# Altium PCB OFP_SCM_v1.6.PcbDoc (part 3 of 3)
Units mil, origin at the board's own origin, x right, y up, seen from the top; angles counter-clockwise.
Board outline 4724.41 x 4330.71 mil, 2 copper layers (Top Layer, Bottom Layer), stack 62.256 mil thick; 103 components, 84 nets, 458 pads, 396 vias.
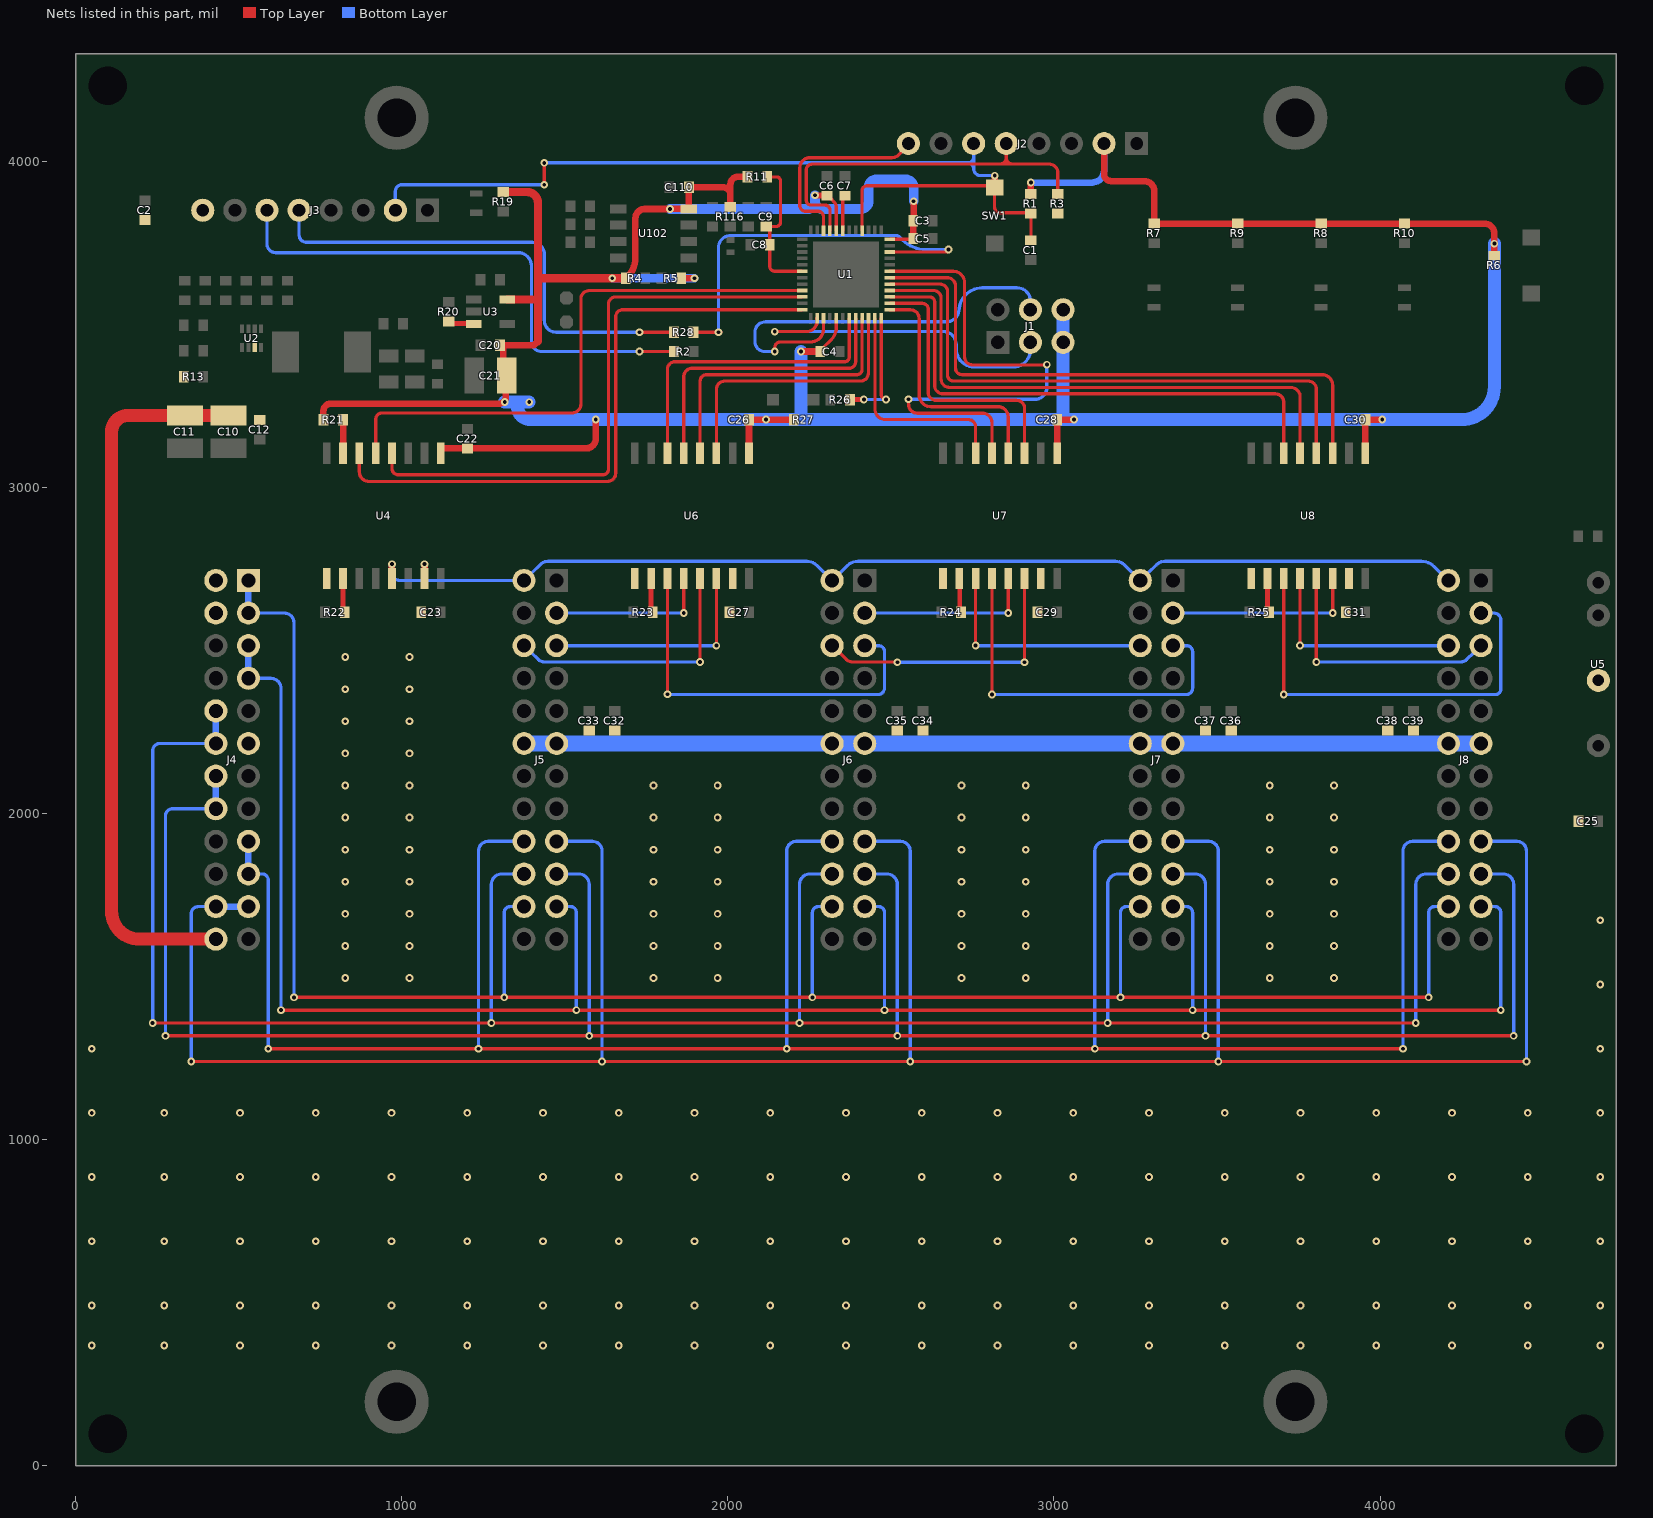
[diagram p2: the nets of this part, all layers, seen from the top]

## Via types
v1: diameter 23.62, hole 11.81, Top Layer to Bottom Layer, tented both sides, 396 vias

## Nets (pads, with @x,y where several pads share a name; then routed paths per layer and width w, separated by ;. In a path a pad name is that pad's centre, name@x,y a point inside that pad or via, vN(x,y) a via of type N, cw(c..) or ccw(c..) an arc to the next point about the centre after c; other vN are vias at no path point) (continued)
NetR20_1: R20.1 U3.3 | length 78.3
  Top Layer w10: R20.1@1144.48,3509.37 1156.98,3501.78 R20.1@1160.2,3501.78
  Top Layer w15: R20.1@1160.2,3503.65 1204.07,3503.65 U3.3@1220.58,3501.97
NetR21_1: R21.1 U4.7 | length 108.7
  Top Layer w10: R21.1@819.88,3206.1 cw(c822.44,3206.1) R21.1@822.44,3208.66
  Top Layer w20: U4.7@819.88,3101.39 R21.1@819.88,3206.1
NetR22_1: R22.1 U4.10 | length 102.4
  Top Layer w10: U4.10@819.88,2725.39 cw(c819.88,2722.83) U4.10@822.44,2722.83
  Top Layer w15: R22.1@819.88,2623.11 U4.10@819.88,2721.46
NetR23_2: R23.2 U6.10 | length 102.4
  Top Layer w10: U6.10@1764.76,2725.39 cw(c1764.76,2722.83) U6.10@1767.32,2722.83
  Top Layer w15: R23.2@1764.76,2623.11 U6.10@1764.76,2721.46
NetR24_2: R24.2 U7.10 | length 105.4
  Top Layer w15: U7.10@2709.65,2721.46 2710.85,2720.25 2710.85,2621.9 R24.2@2714.65,2618.11
NetR25_2: R25.2 U8.10 | length 102.4
  Top Layer w10: R25.2@3654.53,2620.67 ccw(c3657.09,2620.67) R25.2@3657.09,2618.11
  Top Layer w15: R25.2@3654.53,2623.11 U8.10@3654.53,2721.46
NetR26_1: R26.1 U1.24 | length 368.6
  Top Layer w10: U1.24@2470.47,3519.39 2470.47,3284.53 ccw(c2485,3284.53) v1(2485,3270)
  Top Layer w15: R26.1@2374.08,3270 v1(2417,3270)
  Bottom Layer w10: v1(2417,3270) v1(2485,3270)
NetR28_1: R28.1 U1.34 | length 1265.8
  Top Layer w10: R28.1@1895.19,3476.38 v1(1971,3476.38) v1@1978,3476.38 ; U1.34@2496.35,3722.44 2669.02,3722.44 ccw(c2669.02,3729.84) v1(2676.42,3729.84)
  Bottom Layer w10: v1(1971,3476.38) 1971,3735.12 cw(c2009.2,3735.12) 2009.2,3773.32 2511.96,3773.32 cw(c2511.96,3750) 2528.45,3766.49 2535.82,3759.12 ccw(c2606.53,3829.84) 2606.53,3729.84 v1(2676.42,3729.84)
NGND: C23.1 C25.1 C27.1 C29.1 C31.1 C32.1 C33.1 C34.1 C35.1 C36.1 C37.1 C38.1 C39.1 J4.2 J4.4 J4.11 J5.11 J5.12 J6.11 J6.12 J7.11 J7.12 J8.11 J8.12 U4.9 U4.15 U5.4 U6.9 U6.15 U7.9 U7.15 U8.9 U8.15 | length 2974.6
  Top Layer w20: U4.15@1069.88,2725.39 v1(1069.88,2765.31)
  Bottom Layer w50: J5.12@1374.8,2215.35 J5.11@1474.8,2215.35 J6.12@2319.68,2215.35 J6.11@2419.68,2215.35 J7.12@3264.57,2215.35 J7.11@3364.57,2215.35 J8.12@4209.45,2215.35 J8.11@4309.45,2215.35
  other v1: 49.37,369.33 271.65,369.33 503.94,369.33 736.22,369.33 968.5,369.33 1200.79,369.33 1433.07,369.33 1665.35,369.33 1897.64,369.33 2129.92,369.33 2362.2,369.33 2594.49,369.33 2826.77,369.33 3059.05,369.33 3291.34,369.33 3523.62,369.33 3755.91,369.33 3988.19,369.33 4220.47,369.33 4452.76,369.33 4675.04,369.33 49.37,492.13 271.65,492.13 503.94,492.13 736.22,492.13 968.5,492.13 1200.79,492.13 1433.07,492.13 1665.35,492.13 1897.64,492.13 2129.92,492.13 2362.2,492.13 2594.49,492.13 2826.77,492.13 3059.05,492.13 3291.34,492.13 3523.62,492.13 3755.91,492.13 3988.19,492.13 4220.47,492.13 4452.76,492.13 4675.04,492.13 49.37,688.98 271.65,688.98 503.94,688.98 736.22,688.98 968.5,688.98 1200.79,688.98 1433.07,688.98 1665.35,688.98 1897.64,688.98 2129.92,688.98 2362.2,688.98 2594.49,688.98 2826.77,688.98 3059.05,688.98 3291.34,688.98 3523.62,688.98 3755.91,688.98 3988.19,688.98 4220.47,688.98 4452.76,688.98 4675.04,688.98 49.37,885.83 271.65,885.83 503.94,885.83 736.22,885.83 968.5,885.83 1200.79,885.83 1433.07,885.83 1665.35,885.83 1897.64,885.83 2129.92,885.83 2362.2,885.83 2594.49,885.83 2826.77,885.83 3059.05,885.83 3291.34,885.83 3523.62,885.83 3755.91,885.83 3988.19,885.83 4220.47,885.83 4452.76,885.83 4675.04,885.83 49.37,1082.68 271.65,1082.68 503.94,1082.68 736.22,1082.68 968.5,1082.68 1200.79,1082.68 1433.07,1082.68 1665.35,1082.68 1897.64,1082.68 2129.92,1082.68 2362.2,1082.68 2594.49,1082.68 2826.77,1082.68 3059.05,1082.68 3291.34,1082.68 3523.62,1082.68 3755.91,1082.68 3988.19,1082.68 4220.47,1082.68 4452.76,1082.68 4675.04,1082.68 49.37,1279.53 4675.04,1279.53 4675.04,1476.38 826.77,1496.06 1023.62,1496.06 1771.65,1496.06 1968.5,1496.06 2716.54,1496.06 2913.39,1496.06 3661.42,1496.06 3858.27,1496.06 826.77,1594.49 1023.62,1594.49 1771.65,1594.49 1968.5,1594.49 2716.54,1594.49 2913.39,1594.49 3661.42,1594.49 3858.27,1594.49 4675.04,1673.23 826.77,1692.91 1023.62,1692.91 1771.65,1692.91 1968.5,1692.91 2716.54,1692.91 2913.39,1692.91 3661.42,1692.91 3858.27,1692.91 826.77,1791.34 1023.62,1791.34 1771.65,1791.34 1968.5,1791.34 2716.54,1791.34 2913.39,1791.34 3661.42,1791.34 3858.27,1791.34 826.77,1889.76 1023.62,1889.76 1771.65,1889.76 1968.5,1889.76 2716.54,1889.76 2913.39,1889.76 3661.42,1889.76 3858.27,1889.76 826.77,1988.19 1023.62,1988.19 1771.65,1988.19 1968.5,1988.19 2716.54,1988.19 2913.39,1988.19 3661.42,1988.19 3858.27,1988.19 826.77,2086.61 1023.62,2086.61 1771.65,2086.61 1968.5,2086.61 2716.54,2086.61 2913.39,2086.61 3661.42,2086.61 3858.27,2086.61 826.77,2185.04 1023.62,2185.04 826.77,2283.46 1023.62,2283.46 826.77,2381.89 1023.62,2381.89 826.77,2480.31 1023.62,2480.31
NRST: C1.2 J2.6 J3.2 R1.2 SW1.1 U1.40 | length 2966.5
  Top Layer w10: v1(1437.01,3928.82) v1(1437.01,3995.75) ; U1.40@2411.42,3788.78 2411.42,3911.02 cw(c2425.59,3911.02) 2425.59,3925.2 SW1.1@2817.83,3925.2 ; SW1.1@2796.06,3904.45 SW1.1@2796.06,3904.66 ; SW1.1@2818.11,3920.51 SW1.1@2817.83,3920.23 2817.83,3859.33 ccw(c2834.65,3859.33) 2834.65,3842.52 2929.13,3842.52 R1.2@2929.13,3840.08 C1.2@2929.13,3758.35
  Top Layer w20: SW1.1@2818.11,3920.51 v1(2818.11,3956.69)
  Bottom Layer w10: J3.2@980.31,3850.39 980.31,3908.83 cw(c1000.3,3908.83) 1000.3,3928.82 v1(1437.01,3928.82) ; v1(1437.01,3995.75) 2736.16,3995.75 ; 2727.61,3995.58 2753.54,3995.58 ; 2753.54,3978.37 ccw(c2736.16,3978.37) 2736.16,3995.75 ; J2.6@2753.54,4055.12 2753.54,4013.13 ; v1(2818.11,3956.69) 2774.88,3956.69 cw(c2774.88,3978.03) 2753.54,3978.03 2753.54,4013.13 ; 2736.16,3995.75 ccw(c2736.16,4013.13) 2753.54,4013.13
SCLK: J5.2 J6.2 J7.2 J8.2 U4.13 | length 3452.6
  Top Layer w20: U4.13@969.88,2725.39 v1(969.88,2765.31)
  Bottom Layer w10: v1(969.88,2765.31) 969.88,2738.78 ccw(c993.31,2738.78) 993.31,2715.35 J5.2@1374.8,2715.35 1424.36,2763.74 1424.54,2763.92 cw(c1449.49,2738.81) 1449.49,2774.21 ; 1449.54,2774.21 2242.54,2774.21 2242.63,2774.21 cw(c2242.61,2732.98) 2271.68,2762.22 2271.88,2762.02 J6.2@2319.68,2715.35 ; J6.2@2319.68,2715.35 2365.64,2760.23 2365.87,2760.45 cw(c2399.23,2726.9) 2399.23,2774.21 3188.71,2774.21 cw(c3188.71,2735.98) 3215.66,2763.09 3215.85,2762.91 J7.2@3264.57,2715.35 3312.74,2762.39 3312.95,2762.59 cw(c3341.12,2734.24) 3341.12,2774.21 4126.33,2774.21 cw(c4126.33,2718.13) 4166.08,2757.7 J8.2@4209.45,2715.35
SERIAL_RXD: J1.3 U1.14 | length 1044.2
  Top Layer w10: v1(2143.93,3478.35) 2240.79,3478.35 ccw(c2240.79,3511.25) U1.14@2272.73,3519.17
  Bottom Layer w10: v1(2143.93,3478.35) 2660.96,3478.35 cw(c2660.96,3439.37) 2699.94,3439.37 2699.94,3425.66 ccw(c2755.6,3425.66) 2755.6,3370 2875,3370 ccw(c2875,3422.76) J1.3@2927.76,3422.76
  Bottom Layer w15: J1.3@2927.76,3439.37 J1.3@2927.76,3445.37
SERIAL_TXD: J1.4 U1.15 | length 1309.5
  Top Layer w10: 2143.93,3429.82 cw(c2160.66,3429.82) 2160.66,3446.55 2253.57,3446.55 ccw(c2253.57,3486.13) 2293.15,3486.13 2293.15,3519.39 U1.15@2293.3,3519.39
  Bottom Layer w10: v1(2143.93,3417.32) 2113.26,3417.32 cw(c2113.26,3447.58) 2083,3447.58 2083,3476.1 cw(c2115.11,3476.1) 2115.11,3508.21 2669.7,3508.21 ccw(c2669.7,3547.24) 2708.74,3547.24 ; 2708.74,3541.24 cw(c2780.33,3541.24) 2780.33,3612.83 2886.63,3612.83 cw(c2886.63,3571.71) J1.4@2927.76,3571.71 ; J1.4@2927.76,3539.37 J1.4@2927.76,3545.37 J1.4@2927.76,3571.71 ; J1.4@2927.76,3577.71 J1.4@2927.76,3571.71
SPI_CSS1: U1.22 U6.3 | length 861.5
  Top Layer w10: U6.3@1964.76,3101.39 1964.76,3300.65 cw(c1990.88,3300.65) 1990.88,3326.77 2406.64,3326.77 ccw(c2406.64,3351.24) 2431.1,3351.24 U1.22@2431.1,3518.31
SPI_CSS2: U1.21 U6.4 | length 898.3
  Top Layer w10: U6.4@1914.76,3101.39 1914.76,3325.97 cw(c1935.25,3325.97) 1935.25,3346.46 2396.38,3346.46 ccw(c2396.38,3361.5) 2411.42,3361.5 U1.21@2411.42,3518.31
SPI_CSS3: U1.20 U6.5 | length 924.2
  Top Layer w10: U6.5@1864.76,3101.39 1864.76,3340.03 cw(c1890.88,3340.03) 1890.88,3366.14 2372.05,3366.14 ccw(c2372.05,3385.83) 2391.73,3385.83 U1.20@2391.73,3518.31
SPI_CSS4: U1.19 U6.6 | length 958.5
  Top Layer w10: U6.6@1814.76,3101.39 1814.76,3362.98 cw(c1837.61,3362.98) 1837.61,3385.83 2358.27,3385.83 ccw(c2358.27,3399.61) 2372.05,3399.61 U1.19@2372.05,3518.31
SPI_CSS5: U1.26 U7.3 | length 847.6
  Top Layer w10: U1.26@2497.44,3564.96 2596.65,3564.96 cw(c2596.65,3547.24) 2614.37,3547.24 2614.37,3291.24 ccw(c2637.89,3291.24) 2637.89,3267.72 2885.19,3267.72 cw(c2885.19,3243.26) 2909.65,3243.26 U7.3@2909.65,3105.31 U7.3@2909.65,3101.39
SPI_CSS6: U1.25 U7.4 | length 777.2
  Top Layer w10: U1.25@2506.91,3544.76 U1.25@2496.35,3545.27 2559.57,3545.27 cw(c2559.57,3518.31) 2586.53,3518.31 2586.53,3284.35 ccw(c2622.74,3284.24) 2622.89,3248.03 2828.37,3248.03 cw(c2828.37,3216.76) 2859.65,3216.76 U7.4@2859.65,3105.31 U7.4@2859.65,3101.39
SPI_CSS7: U1.31 U7.5 | length 1659.1
  Top Layer w10: U1.31@2496.35,3663.38 2690.72,3663.38 cw(c2690.72,3628.42) 2725.68,3628.42 2725.68,3400.25 ccw(c2749.64,3400.25) 2749.64,3376.29 v1@2978,3376.29 ; 2554,3254.15 v1(2554,3270.71) ; 2554.47,3254.15 ccw(c2580.28,3254.15) 2580.28,3228.35 2780.6,3228.35 cw(c2780.6,3199.31) 2809.65,3199.31 U7.5@2809.65,3105.31 U7.5@2809.65,3101.39
  Bottom Layer w10: v1(2554,3270.71) 2941.62,3270.71 ccw(c2941.62,3307.09) 2978,3307.09 v1(2978,3377)
SPI_CSS8: U1.23 U7.6 | length 702.2
  Top Layer w10: U1.23@2450.79,3518.31 2450.79,3241.14 ccw(c2483.27,3241.14) 2483.27,3208.66 2737.23,3208.66 cw(c2737.23,3186.24) 2759.65,3186.24 U7.6@2759.65,3101.39
SPI_CSS9: U1.30 U8.3 | length 1865.9
  Top Layer w10: U1.30@2497.44,3643.7 2672.13,3643.7 cw(c2672.13,3617.72) 2698.11,3617.72 2698.11,3366.11 ccw(c2717.77,3366.11) 2717.77,3346.46 3822.16,3346.46 cw(c3822.16,3314.08) 3854.53,3314.08 U8.3@3854.53,3105.31 U8.3@3854.53,3101.39
SPI_CSS10: U1.29 U8.4 | length 1801.3
  Top Layer w10: U1.29@2497.44,3624.02 2650.75,3624.02 cw(c2650.75,3601.34) 2673.42,3601.34 2673.42,3345.24 ccw(c2691.9,3345.24) 2691.9,3326.77 3779.43,3326.77 cw(c3779.43,3301.67) 3804.53,3301.67 U8.4@3804.53,3105.31 U8.4@3804.53,3101.39
SPI_CSS11: U1.28 U8.5 | length 1726.9
  Top Layer w10: U1.28@2497.44,3604.33 2630.47,3604.33 cw(c2630.47,3581.06) 2653.74,3581.06 2653.74,3333.12 ccw(c2679.77,3333.12) 2679.77,3307.09 3726.52,3307.09 cw(c3726.52,3279.08) 3754.53,3279.08 U8.5@3754.53,3105.31 U8.5@3754.53,3101.39
SPI_CSS12: U1.27 U8.6 | length 1661.6
  Top Layer w10: U1.27@2497.44,3584.65 2618.93,3584.65 cw(c2618.93,3569.52) 2634.05,3569.52 2634.05,3313.33 ; 2634.05,3313.26 ccw(c2659.92,3313.26) 2659.92,3287.4 3678.7,3287.4 cw(c3678.7,3261.58) 3704.53,3261.58 U8.6@3704.53,3101.39
SPI_MISO: U1.12 U4.6 | length 1933.3
  Top Layer w10: U4.6@869.88,3101.39 869.88,3048.48 ccw(c899.49,3048.48) 899.49,3018.86 1631,3018.86 ccw(c1631,3043.73) 1655.87,3043.73 1655.87,3523.49 cw(c1677.66,3523.49) 1677.66,3545.28 U1.12@2226.97,3545.28
SPI_MOSI: U1.9 U4.5 | length 1774.8
  Top Layer w10: U4.5@919.88,3105.31 919.88,3208.8 cw(c940.16,3208.8) 940.16,3229.08 1522.32,3229.08 ccw(c1522.32,3256.22) 1549.46,3256.22 1549.46,3578.77 cw(c1575.02,3578.77) 1575.02,3604.33 U1.9@2226.97,3604.33
SPI_SCK: U1.10 U4.4 | length 1839.5
  Top Layer w10: U4.4@969.88,3101.39 969.88,3058.66 ccw(c989.29,3058.66) 989.29,3039.25 1616.91,3039.25 ccw(c1616.91,3056.2) 1633.86,3056.2 1633.86,3562.58 cw(c1655.92,3562.58) 1655.92,3584.65 U1.10@2226.97,3584.65
SS1: J5.5 U6.14 | length 700
  Top Layer w10: v1(1964.76,2515.35) U6.14@1964.76,2725.39
  Bottom Layer w10: J5.5@1474.8,2515.35 v1(1964.76,2515.35)
SS2: J5.6 U6.13 | length 819.3
  Top Layer w10: v1(1914.76,2465.35) U6.13@1914.76,2721.46 U6.13@1914.76,2725.39
  Bottom Layer w10: J5.6@1374.8,2515.35 1418.17,2473.01 1418.31,2472.88 ccw(c1436.61,2491.37) 1436.61,2465.35 ; 1436.65,2465.35 v1(1914.76,2465.35)
SS3: J5.3 U6.12 | length 500
  Top Layer w10: v1(1864.76,2615.35) U6.12@1864.76,2725.39
  Bottom Layer w10: J5.3@1474.8,2615.35 v1(1864.76,2615.35)
SS4: J6.5 U6.11 | length 1218.9
  Top Layer w10: v1(1814.76,2366.14) U6.11@1814.76,2721.46 U6.11@1814.76,2725.39
  Bottom Layer w10: v1@1814.76,2365.35 2444.74,2365.35 2459.9,2365.35 ccw(c2459.9,2385.76) 2480.31,2385.44 ccw(c2459.9,2385.76) 2480.31,2385.76 2480.31,2497.17 ccw(c2462.13,2497.17) 2462.13,2515.35 J6.5@2419.68,2515.35
SS5: J6.6 U7.14 | length 870.3
  Top Layer w10: J6.6@2319.68,2515.35 2363.05,2473.01 ; 2363.19,2472.88 ccw(c2381.49,2491.37) 2381.49,2465.35 2518.9,2465.35 cw(c2518.9,2464.57) v1(2519.68,2464.57) ; v1(2909.65,2464.57) U7.14@2909.65,2725.39
  Bottom Layer w10: v1(2519.68,2464.57) v1(2909.65,2464.57)
SS6: J6.3 U7.13 | length 550
  Top Layer w10: v1(2859.65,2615.35) U7.13@2859.65,2725.39
  Bottom Layer w10: J6.3@2419.68,2615.35 v1(2859.65,2615.35)
SS7: J7.5 U7.12 | length 1168.9
  Top Layer w10: v1@2809.65,2366.14 U7.12@2809.65,2725.39
  Bottom Layer w10: v1(2809.65,2365.35) 3404.79,2365.35 ccw(c3404.79,2385.76) 3425.2,2385.76 3425.2,2497.17 ccw(c3407.01,2497.17) 3407.01,2515.35 J7.5@3364.57,2515.35
SS8: J7.6 U7.11 | length 714.5
  Top Layer w10: v1(2759.65,2515.75) U7.11@2759.65,2725.39
  Bottom Layer w10: v1@2759.84,2515.75 2760.24,2515.35 J7.6@3264.57,2515.35
SS9: J7.3 U8.14 | length 600
  Top Layer w10: v1(3854.53,2615.35) U8.14@3854.53,2725.39
  Bottom Layer w10: J7.3@3364.57,2615.35 v1(3854.53,2615.35)
SS10: J8.5 U8.13 | length 784.2
  Top Layer w10: v1(3804.53,2465.35) U8.13@3804.53,2721.46 U8.13@3804.53,2725.39
  Bottom Layer w10: v1(3804.53,2465.35) 4247.6,2465.35 ; 4247.64,2465.35 ccw(c4247.64,2491.37) 4265.94,2472.88 4266.08,2473.02 J8.5@4309.45,2515.35
SS11: J8.6 U8.12 | length 664.6
  Top Layer w10: v1(3754.53,2515.75) U8.12@3754.53,2725.39
  Bottom Layer w10: v1@3754.53,2515.35 J8.6@4209.45,2515.35
SS12: J8.3 U8.11 | length 1322.3
  Top Layer w10: v1(3704.53,2365.35) U8.11@3704.53,2721.46 U8.11@3704.53,2725.39
  Bottom Layer w10: v1(3704.53,2365.35) 4353.55,2365.35 ccw(c4353.55,2381.89) 4370.08,2381.89 4370.08,2594.49 ccw(c4349.21,2594.49) 4349.21,2615.35 J8.3@4309.45,2615.35 ; v1@3704.53,2366.14 ccw(c3706.43,2368.04) v1@3706.43,2365.35
SWDCLK: J2.5 R3.1 U1.45 | length 1231.1
  Top Layer w10: 2258.8,3992.13 ccw(c2258.8,3973.48) 2240.16,3973.48 2240.16,3881.45 ccw(c2255.4,3881.45) 2255.4,3866.21 2298.17,3866.21 cw(c2298.17,3851.39) 2312.99,3851.39 U1.45@2312.99,3787.69 ; 2258.84,3992.13 2853.54,3992.13 ; 2834.65,3992.13 ccw(c2834.65,4011.02) 2853.54,4011.02 ccw(c2872.44,4011.02) 2872.44,3992.13 ; J2.5@2853.54,4055.12 2853.54,3992.13 ; R3.1@3011.81,3900.08 3011.81,3965.71 ccw(c2985.39,3965.71) 2985.39,3992.13 2853.54,3992.13
SWDIO: J2.8 U1.46 | length 619.9
  Top Layer w10: U1.46@2293.3,3787.69 2293.3,3830.58 ccw(c2276.54,3830.58) 2276.54,3847.34 2238.6,3847.34 cw(c2238.6,3865.47) 2220.47,3865.47 2220.47,3980.71 cw(c2251.57,3980.71) 2251.57,4011.81 2503.54,4011.81 ccw(c2503.54,4040.67) 2523.95,4020.26 J2.8@2556.17,4052.49
UART_RXD: J3.5 R28.2 | length 1482.4
  Top Layer w10: v1(1728.91,3476.38) 1834.17,3476.38 R28.2@1834.67,3476.38
  Bottom Layer w10: J3.5@685.04,3850.39 685.04,3775.47 ccw(c708.54,3775.47) 708.54,3751.97 1400.88,3751.97 cw(c1400.88,3715.85) 1437.01,3715.85 1437.01,3512.85 ccw(c1473.48,3512.85) 1473.48,3476.38 v1(1728.91,3476.38)
UART_TXD: J3.6 R2.2 | length 1638.1
  Top Layer w10: v1(1728.9,3417.32) R2.2@1834.16,3417.32
  Bottom Layer w10: J3.6@586.61,3850.39 586.61,3747.55 ccw(c613.69,3747.55) 613.69,3720.47 1356.81,3720.47 cw(c1356.81,3679.65) 1397.64,3679.65 1397.64,3448.6 ccw(c1428.92,3448.6) 1428.92,3417.32 v1(1728.9,3417.32)
VA_N: J4.21 J4.22 J5.17 J6.17 J7.17 J8.17 | length 7943.3
  Top Layer w10: v1(354.33,1240.16) v1(1614.17,1240.16) v1(2559.05,1240.16) v1(3503.94,1240.16) v1(4448.82,1240.16)
  Bottom Layer w10: v1(354.33,1240.16) 354.33,1693.16 ; 354.33,1693.2 cw(c376.48,1693.2) 376.48,1715.35 J4.22@429.92,1715.35 ; J5.17@1474.8,1915.35 1584.65,1915.35 cw(c1584.65,1885.83) 1614.17,1885.83 v1(1614.17,1240.16) ; J6.17@2419.68,1915.35 2529.53,1915.35 cw(c2529.53,1885.83) 2559.05,1885.83 v1(2559.05,1240.16) ; J7.17@3364.57,1915.35 3474.41,1915.35 cw(c3474.41,1885.83) 3503.94,1885.83 v1(3503.94,1240.16) ; J8.17@4309.45,1915.35 4419.29,1915.35 cw(c4419.29,1885.83) 4448.82,1885.83 v1(4448.82,1240.16)
  Bottom Layer w20: J4.22@429.92,1715.35 J4.21@529.92,1715.35
VA_P: J4.17 J4.19 J5.18 J6.18 J7.18 J8.18 | length 7222.9
  Top Layer w10: v1(590.55,1279.53) v1(1235.43,1279.53) v1(2180.31,1279.53) v1(3125.2,1279.53) v1(4070.08,1279.53) v1@4074.8,1279.53
  Bottom Layer w10: J4.19@529.92,1815.35 572.05,1815.35 cw(c572.05,1796.85) 590.55,1796.85 v1(590.55,1279.53) ; v1(1235.43,1279.53) 1235.43,1885.83 cw(c1264.96,1885.83) 1264.96,1915.35 J5.18@1374.8,1915.35 ; v1(2180.31,1279.53) 2180.31,1885.83 cw(c2209.84,1885.83) 2209.84,1915.35 J6.18@2319.68,1915.35 ; v1(3125.2,1279.53) 3125.2,1885.83 cw(c3154.72,1885.83) 3154.72,1915.35 J7.18@3264.57,1915.35 ; v1(4070.08,1279.53) 4070.08,1885.83 cw(c4099.61,1885.83) 4099.61,1915.35 J8.18@4209.45,1915.35
  Bottom Layer w20: J4.19@529.92,1815.35 J4.17@529.92,1915.35
VB_N: J4.14 J4.16 J5.19 J6.19 J7.19 J8.19 | length 7406.5
  Top Layer w10: v1(275.59,1318.9) v1(1574.8,1318.9) v1(2519.68,1318.9) v1(3464.57,1318.9) v1(4409.45,1318.9)
  Bottom Layer w10: v1(275.59,1318.9) 275.59,1993.96 cw(c296.99,1993.96) 296.99,2015.35 J4.16@429.92,2015.35 ; J5.19@1474.8,1815.35 1542.91,1815.35 cw(c1542.91,1783.46) 1574.8,1783.46 v1(1574.8,1318.9) ; J6.19@2419.68,1815.35 2487.79,1815.35 cw(c2487.79,1783.46) 2519.68,1783.46 v1(2519.68,1318.9) ; J7.19@3364.57,1815.35 3432.68,1815.35 cw(c3432.68,1783.46) 3464.57,1783.46 v1(3464.57,1318.9) ; J8.19@4309.45,1815.35 4377.56,1815.35 cw(c4377.56,1783.46) 4409.45,1783.46 v1(4409.45,1318.9)
  Bottom Layer w20: J4.16@429.92,2015.35 J4.14@429.92,2115.35
VB_P: J4.10 J4.12 J5.20 J6.20 J7.20 J8.20 | length 7192.8
  Top Layer w10: v1(236.22,1358.27) 1279.53,1358.27 2224.41,1358.27 3169.29,1358.27 v1(4109.45,1358.27) v1@4114.17,1358.27
  Bottom Layer w10: v1(236.22,1358.27) 236.22,2193.08 cw(c258.5,2193.08) 258.5,2215.35 J4.12@429.92,2215.35 ; v1(1274.8,1358.27) 1274.8,1783.46 cw(c1306.69,1783.46) 1306.69,1815.35 J5.20@1374.8,1815.35 ; v1(2219.68,1358.27) 2219.68,1783.46 cw(c2251.57,1783.46) 2251.57,1815.35 J6.20@2319.68,1815.35 ; v1(3164.57,1358.27) 3164.57,1783.46 cw(c3196.46,1783.46) 3196.46,1815.35 J7.20@3264.57,1815.35 ; v1(4109.45,1358.27) 4109.45,1783.46 cw(c4141.34,1783.46) 4141.34,1815.35 J8.20@4209.45,1815.35
  Bottom Layer w20: J4.12@429.92,2215.35 J4.10@429.92,2315.35
VC_N: J4.5 J4.7 J5.21 J6.21 J7.21 J8.21 | length 6425.8
  Top Layer w10: v1(629.92,1397.64) v1(1535.43,1397.64) v1(2480.31,1397.64) v1(3425.2,1397.64) v1(4370.08,1397.64)
  Bottom Layer w10: J4.7@529.92,2415.35 598.03,2415.35 cw(c598.03,2383.46) 629.92,2383.46 v1(629.92,1397.64) ; J5.21@1474.8,1715.35 1516.93,1715.35 cw(c1516.93,1696.85) 1535.43,1696.85 v1(1535.43,1397.64) ; J6.21@2419.68,1715.35 2461.81,1715.35 cw(c2461.81,1696.85) 2480.31,1696.85 v1(2480.31,1397.64) ; J7.21@3364.57,1715.35 3406.69,1715.35 cw(c3406.69,1696.85) 3425.2,1696.85 v1(3425.2,1397.64) ; J8.21@4309.45,1715.35 4351.57,1715.35 cw(c4351.57,1696.85) 4370.08,1696.85 v1(4370.08,1397.64)
  Bottom Layer w20: J4.7@529.92,2415.35 J4.5@529.92,2515.35
VC_P: J4.1 J4.3 J5.22 J6.22 J7.22 J8.22 | length 6213.4
  Top Layer w10: v1(669.29,1437.01) v1(1314.17,1437.01) v1(2259.05,1437.01) v1(3203.94,1437.01) v1(4148.82,1437.01) v1@4153.54,1437.01
  Bottom Layer w10: J4.3@529.92,2615.35 639.76,2615.35 cw(c639.76,2585.83) 669.29,2585.83 v1(669.29,1437.01) ; v1(1314.17,1437.01) 1314.17,1696.85 cw(c1332.68,1696.85) 1332.68,1715.35 J5.22@1374.8,1715.35 ; v1(2259.05,1437.01) 2259.05,1696.85 cw(c2277.56,1696.85) 2277.56,1715.35 J6.22@2319.68,1715.35 ; v1(3203.94,1437.01) 3203.94,1696.85 cw(c3222.44,1696.85) 3222.44,1715.35 J7.22@3264.57,1715.35 ; v1(4148.82,1437.01) 4148.82,1696.85 cw(c4167.32,1696.85) 4167.32,1715.35 J8.22@4209.45,1715.35
  Bottom Layer w20: J4.3@529.92,2615.35 J4.1@529.92,2715.35
VCORE: C7.2 U1.43 | length 104.5
  Top Layer w10: U1.43@2352.36,3787.69 C7.2@2352.36,3892.18
VDD: C3.2 C4.2 C5.2 C6.2 C20.2 C21.2 C22.2 C26.2 C28.2 C30.2 C110.1 J1.5 J1.6 J2.2 R1.1 R3.2 R4.2 R5.2 R6.2 R7.2 R8.2 R9.2 R10.2 R11.1 R19.2 R21.2 R27.2 R116.1 U1.17 U1.36 U1.44 U3.5 U4.1 U6.1 U7.1 U8.1 U102.8 | length 11412.5
  Top Layer w10: U6.1@2064.76,3101.39 U6.1@2064.76,3105.31 ; C26.2@2064.76,3203.66 cw(c2069.76,3203.66) C26.2@2069.76,3208.66 ; C4.2@2283.15,3417.32 2283.15,3419.82 C4.2@2293.15,3429.82 ; C4.2@2293.19,3429.82 2316.98,3453.61 ccw(c2279.1,3491.5) 2332.68,3491.5 U1.17@2332.68,3518.31 ; C6.2@2303.96,3895.2 2313.96,3885.2 2316.47,3885.2 2324.96,3876.71 cw(c2306.33,3858.08) 2332.68,3858.08 U1.44@2332.68,3788.78 ; U1.36@2497.44,3761.81 2566.46,3761.81 C5.2@2568.42,3763.78 ; U7.1@3009.65,3101.39 U7.1@3009.65,3105.31 ; C28.2@3009.65,3203.66 cw(c3014.65,3203.66) C28.2@3014.65,3208.66 ; U8.1@3954.53,3101.39 U8.1@3954.53,3105.31 ; C30.2@3954.53,3203.66 cw(c3959.53,3203.66) C30.2@3959.53,3208.66
  Top Layer w20: R21.2@759.88,3208.66 759.88,3235.37 cw(c781.69,3235.37) 781.69,3257.19 1297.74,3257.19 ccw(c1297.74,3278.78) 1319.34,3278.78 1319.34,3340.89 cw(c1321.65,3340.89) C21.2@1321.65,3343.2 ; U4.1@1121.29,3120 C22.2@1201.65,3120 1564.68,3120 ccw(c1564.68,3150) 1594.68,3150 v1(1594.68,3208.66) ; C20.2@1301.65,3437.01 cw(c1301.65,3427.01) 1311.65,3427.01 C21.2@1311.65,3308.66 ; C20.2@1311.65,3437.01 1405.61,3437.01 1417.32,3448.72 ; 1399.61,3576.77 cw(c1399.61,3559.06) 1417.32,3559.06 ; R4.2@1686.54,3641.73 1693.35,3648.54 ccw(c1637.36,3704.53) 1716.54,3704.53 1716.54,3825.66 cw(c1745.21,3825.66) 1745.21,3854.33 v1(1822.83,3854.33) 1822.83,3854.53 1878.42,3854.53 ccw(c1878.42,3856.5) 1880.39,3856.5 C110.1@1880.39,3921.26 1984.39,3921.26 cw(c1984.39,3897.78) 2007.87,3897.78 ; R5.2@1856.77,3641.73 v1(1897.64,3641.73) ; R116.1@2007.87,3858.27 2007.87,3897.78 ; R11.1@2060.55,3952.76 2030.07,3952.76 ccw(c2030.07,3930.56) 2007.87,3930.56 2007.87,3897.78 ; U6.1@2064.76,3105.31 C26.2@2064.76,3203.66 ; C26.2@2069.76,3208.66 v1(2116.61,3208.66) R27.2@2203.97,3208.66 ; v1(2224.41,3417.32) C4.2@2283.15,3417.32 ; v1@2267.35,3896.75 C6.2@2303.97,3895.33 ; C5.2@2568.42,3763.78 C3.2@2568.42,3818.9 2569.65,3820.12 v1@2569.65,3876.73 ; R1.1@2929.13,3900.08 v1(2929.13,3935.51) ; U7.1@3009.65,3105.31 C28.2@3009.65,3203.66 ; C28.2@3014.65,3208.66 v1(3061.5,3208.66) ; J2.2@3153.54,4055.12 3153.54,3961.46 ccw(c3175,3961.46) 3175,3940 3277.02,3940 cw(c3277.02,3909.93) 3307.09,3909.93 R7.2@3307.09,3809.53 R9.2@3562.99,3809.53 R8.2@3818.9,3809.53 R10.2@4074.8,3809.53 4319.19,3809.53 cw(c4319.19,3778.32) 4350.39,3778.32 v1(4350.39,3748.03) R6.2@4350.39,3711.1 ; U8.1@3954.53,3105.31 C30.2@3954.53,3203.66 ; C30.2@3959.53,3208.66 v1(4006.38,3208.66)
  Top Layer w25: R19.2@1311.02,3906.2 1385,3906.2 cw(c1385,3873.88) 1417.32,3873.88 1417.32,3641.73 ; U3.5@1323.73,3576.77 1399.61,3576.77 ; 1417.32,3448.72 1417.32,3559.06 1417.32,3641.73 ; R4.2@1686.54,3641.73 v1(1645.67,3641.73) 1417.32,3641.73
  Bottom Layer w15: v1@1390.74,3262.26 v1(1391,3262) ; 3027.76,3209.55 ccw(c3028.65,3209.55) 3028.65,3208.66
  Bottom Layer w20: v1(2929.13,3935.51) 3116.71,3935.51 ccw(c3116.71,3972.34) 3153.54,3972.34 J2.2@3153.54,4055.12
  Bottom Layer w25: v1(1645.67,3641.73) v1(1897.64,3641.73)
  Bottom Layer w30: v1(1822.83,3854.33) 2245.67,3854.33 ccw(c2245.67,3876) 2267.34,3876 ; v1(2267.34,3896.44) 2267.34,3876 ; v1(2569.65,3877.95) 2569.65,3920.64 ccw(c2545.4,3920.64) 2545.4,3944.88 2455.3,3944.88 ccw(c2455.3,3921.08) 2431.5,3921.08 2431.5,3877.95 cw(c2407.88,3877.95) 2407.88,3854.33 2289.01,3854.33 cw(c2289.01,3876) 2267.34,3876
  Bottom Layer w40: v1(1315.65,3262.26) 1353.19,3262.26 ; v1@1390.74,3262.26 1353.19,3262.26 ; v1(2224.41,3417.32) 2224.41,3208.66 ; 2276.1,3208.66 2224.41,3208.66 ; 2281.97,3208.66 3028.65,3208.66 v1(3061.5,3208.66) v1(4006.38,3208.66) 4250.39,3208.66 ccw(c4250.39,3308.66) 4350.39,3308.66 v1(4350.39,3748.03) ; 3027.76,3209.55 J1.5@3027.76,3445.37 J1.6@3027.76,3545.37 ; 1353.19,3262.26 1353.28,3260.51 ccw(c1390.74,3262.26) 1353.45,3258.26 1354.94,3244.39 ccw(c1394.71,3248.66) 1394.71,3208.66 v1(2116.61,3208.66) 2166.85,3208.66 2217,3208.66 2224.41,3208.66
VDDA: C8.2 C9.2 R11.2 U1.6 | length 461.3
  Top Layer w10: R11.2@2118.11,3952.76 2149.61,3952.76 cw(c2149.61,3940.94) 2161.42,3940.94 2161.42,3814.29 cw(c2147.83,3814.3) 2147.83,3800.71 C9.2@2118.11,3800.71 2128.42,3790.39 C8.2@2128.42,3744.09 2128.42,3678.72 ccw(c2143.69,3678.65) 2143.76,3663.39 U1.6@2226.97,3663.39
VIN+: C2.2 C10.2 C11.2 C12.2 J3.8 J4.24 R13.1 U2.3 | length 2226.1
  Top Layer w40: J4.24@429.92,1615.35 195.67,1615.35 cw(c195.67,1700.79) 110.24,1700.79 110.24,3170.84 cw(c160.5,3170.84) 160.5,3221.1 C11.2@335,3221.1 C10.2@469.17,3221.1
pads on no net: C111.1 J2.1 J2.4 J2.7 J4.6 J4.8 J4.9 J4.13 J4.15 J4.18 J4.20 J5.7 J5.8 J5.13 J5.14 J5.15 J5.16 J5.23 J5.24 J6.7 J6.8 J6.13 J6.14 J6.15 J6.16 J6.23 J6.24 J7.7 J7.8 J7.13 J7.14 J7.15 J7.16 J7.23 J7.24 J8.7 J8.8 J8.13 J8.14 J8.15 J8.16 J8.23 J8.24 R112.1 R113.1 R114.1 R115.1 R115.2 R116.2 SB001.1 U1.1 U1.2 U1.3 U1.4 U1.11 U1.13 U1.16 U3.4 U4.3 U4.14 U6.7 U7.7 U8.7 U102.1 U102.2 U102.3 U102.7

## Polygon pours and split planes (outlines as drawn)
NGND on Bottom Layer "NGND_L02_P000" (solid, remove dead copper, pour order 0): 10.2,334.65 4714.21,334.65 4714.21,2449.16 4423.45,2449.16 4423.45,2830 10.2,2830
GND on Bottom Layer "GND_L02_P001" (solid, remove dead copper, pour order 1): 10.2,2978.28 10.2,3996.06 4714.21,3996.06 4714.21,2565.17 4545.92,2565.17 4545.92,2978.28
+5V on Top Layer "+5V_L01_P004" (solid, remove dead copper, pour order 4): 810,3352.2 cw(c810,3369.2) 793,3369.2 793,3679 cw(c810,3679) 810,3696 1254,3696 cw(c1254,3684.25) 1265.75,3684.25 1265.75,3578.46 cw(c1251.85,3578.46) 1251.85,3564.57 1182.18,3564.57 1167.46,3549.85 970.36,3549.85 ccw(c970.36,3538.74) 959.25,3538.74 959.25,3477.75 ccw(c972,3477.75) 972,3465 1116.49,3465 cw(c1116.49,3454.5) 1126.99,3454.5 1126.99,3363.27 1091.99,3363.27 1071.87,3383.39 936.72,3383.39 905.53,3352.2
VDD on Top Layer "VDD_L01_P007" (solid, remove dead copper, pour order 7): 2940.64,3915.08 2894.89,3915.08 ccw(c2894.89,3909.16) 2888.98,3909.16 2888.98,3875.41 ccw(c2895.23,3875.41) 2895.23,3869.16 2951.05,3869.16 cw(c2951.05,3857.21) 2963,3857.21 2963,3825.8 ccw(c2969.9,3825.8) 2969.9,3818.9 3023.13,3818.9 ccw(c3023.13,3825.08) 3029.31,3825.08 3029.31,3855.08 ccw(c3025.06,3855.08) 3025.06,3859.33 2990.81,3859.33 cw(c2990.81,3871.54) 2978.6,3871.54 2978.6,3907.7 ccw(c2971.22,3907.7) 2971.22,3915.08
VIN+ on Top Layer "VIN+_L01_P006" (solid, remove dead copper, pour order 6): 425.84,3369.27 cw(c434.37,3369.27) 434.37,3377.8 506.95,3377.8 544.07,3414.93 544.07,3441.68 555.51,3441.68 555.51,3332.02 581.5,3306.03 581.5,3187.74 cw(c570.87,3187.73) 570.87,3177.1 165,3177.1 ccw(c164.99,3151.11) 139,3151.1 139,2978.36 74,2978.36 74,3807 cw(c102.39,3807) 102.39,3835.39 258.39,3835.39 ccw(c258.39,3850.39) 273.39,3850.39 273.39,3903 cw(c287.39,3903) 287.39,3917 425.84,3917 425.84,3747 247,3747 ccw(c247,3728) 228,3728 228,3383 ccw(c253.11,3383) 253.11,3357.89 355.29,3357.89 355.29,3324.25 ccw(c366.65,3324.25) 366.65,3312.89 417.57,3312.89 ccw(c417.57,3321.16) 425.84,3321.16
NetC16_1 on Top Layer "NETC16_1_L01_P005" (solid, remove dead copper, pour order 5): 613.63,3500.63 ccw(c613.63,3509.91) 622.91,3509.91 622.91,3579.98 cw(c632.11,3579.98) 632.11,3589.17 662.37,3589.17 711.83,3589.17 cw(c711.83,3581) 720,3581 720,3348.47 cw(c711.92,3348.47) 711.92,3340.39 601,3340.39 592.74,3348.65 592.74,3464.3 ccw(c582.8,3464.3) 582.79,3474.25 562.6,3474.25 562.6,3500.63
NGND on Top Layer "NGND_L01_P002" (solid, remove dead copper, pour order 2): 255,2830 255,1715.35 601,1715.35 601,1459.53 10.2,1459.53 10.2,334.65 4714.21,334.65 4714.21,2449.16 4425.32,2449.16 4425.32,2830
GND on Top Layer "GND_L01_P003" (solid, remove dead copper, pour order 3): 10.2,2978.36 10.2,3996.06 4714.21,3996.06 4714.21,2565.17 4545.92,2565.17 4545.92,2978.36
no net on Top Overlay "NONET_L01_P009" (hatched 45Degree grid 35 track 7.5): 4545.92,2975 4545.92,2834 4423.45,2834 255,2834 139,2834 139,2975
no net on Bottom Overlay "NONET_L01_P009" (hatched 45Degree grid 35 track 7.5, pour order 9): 4071.45,2834 4071.45,2920.35 4432.67,2920.35 4432.67,2834 4539.92,2834 4539.92,2975 10.2,2975 10.2,2834 291.92,2834 291.92,2920.35 653.15,2920.35 653.15,2834 1236.8,2834 1236.8,2920.35 1598.03,2920.35 1598.03,2834 2181.68,2834 2181.68,2920.35 2542.91,2920.35 2542.91,2834 3126.57,2834 3126.57,2920.35 3487.79,2920.35 3487.79,2834

## Other copper
Top Layer:
  rectangle net VDD: 1286.65,3247.22 1430,3454.51
  rectangle net VDD: 1286.65,3419.51 1337.86,3454.51
  rectangle net VIN+: 542.91,3324.25 555.51,3442.76
  rectangle net GND: 562.6,3340.67 575.2,3457.27
  region: 2060.09,3866.78 2004.72,3800.79 2012.38,3794.36 2067.75,3860.35
  region: 1949.57,3861.04 2004.94,3795.05 2012.6,3801.48 1957.23,3867.46
  region: 2001.9,3803.15 2001.9,3758.86 2011.9,3758.86 2011.9,3803.15
  region: 1966.06,3810.51 1879.92,3810.51 1879.92,3800.51 1966.06,3800.51
  rectangle: 1577.24,3750.51 1663.39,3760.51
  rectangle: 1577.24,3800.51 1663.39,3810.51
  rectangle: 1577.24,3850.51 1663.39,3860.51
  rectangle net NetLED5_1: 1208.66,3832.83 1316.65,3859.16
  pour cut-out: 793,3338.39 911.74,3338.39 946.67,3373.33 1061.93,3373.33 1081.99,3353.27 1136.99,3353.27 1136.99,3363.07 1137.18,3363.27 1091.99,3363.27 1071.87,3383.39 936.72,3383.39 905.53,3352.2 793,3352.2 793,3599.37 720,3599.37 720,3330.2 793,3330.2
Bottom Layer:
  pour cut-out: 4166.08,2379.92 4166.08,2760.79 4354.88,2760.79 4354.88,2379.92
  pour cut-out: 1338.3,2281.62 1338.3,2715.35 1411.3,2715.35 1411.3,2281.62

## Silkscreen, mask and mechanical layers (free items; w line width, h text height)
Top Overlay:
  drawing of 37 lines, arcs and shapes, not listed
  text "SDA" at 1554.21,3566.13 h60
  text "SCL" at 1549.5,3486.61 h60
Bottom Overlay:
  text "OFP_SCM_V1.5.1" at 4602.85,3174.99 h119 r270
  text "2" at 267.1,2692.87 h100
  text "2" at 1211.98,2692.87 h100
  text "2" at 2156.86,2692.87 h100
  text "2" at 3101.74,2692.87 h100
  text "2" at 4046.62,2692.87 h100
  text "1" at 749.64,2687.55 h100
  text "1" at 1694.53,2687.55 h100
  text "1" at 2639.41,2687.55 h100
  text "1" at 3584.29,2687.55 h100
  text "1" at 4529.17,2687.55 h100
  text "VIM" at 174.87,1411.88 h119 r270
  text "L1 L2 L3 N" at 692.75,1411.88 h119 r270
  text "CIM - BOARD NO.1" at 1121.19,1411.88 h119 r270
  text "CHANNEL 1 2 3" at 1637.63,1411.88 h119 r270
  text "CIM - BOARD NO.2" at 2066.07,1411.88 h119 r270
  text "CHANNEL 4 5 6" at 2582.51,1411.88 h119 r270
  text "CIM - BOARD NO.3" at 3010.95,1411.88 h119 r270
  text "CHANNEL 7 8 9" at 3527.39,1411.88 h119 r270
  text "CIM - BOARD NO.4" at 3955.83,1411.88 h119 r270
  text "CHANNEL 10 11 12" at 4472.28,1411.88 h119 r270
  text "24" at 349.81,1289.24 h100 r270
  text "23" at 551.55,1289.24 h100 r270
  text "24" at 1294.69,1289.24 h100 r270
  text "23" at 1496.43,1289.24 h100 r270
  text "24" at 2239.58,1289.24 h100 r270
  text "23" at 2441.31,1289.24 h100 r270
  text "24" at 3184.46,1289.24 h100 r270
  text "23" at 3386.19,1289.24 h100 r270
  text "24" at 4129.34,1289.24 h100 r270
  text "23" at 4331.08,1289.24 h100 r270
Board Outline:
  the board outline again, w10
Fabrication:
  drawing of 191 lines, arcs and shapes, not listed
  text "Layer" at 5710.34,3790 h60
  text "Name" at 6120.26,3790 h60
  text "Material" at 7050,3790 h60
  text "Thickness" at 7909.77,3790 h60
  text "Constant" at 8559.6,3790 h60
  text "Board Layer Stack" at 9129.46,3790 h60
  text "Top Overlay" at 6120.26,3670 h60
  text "Top Solder" at 6120.26,3550 h60
  text "Solder Resist" at 7050,3550 h60
  text "0.010mm" at 7909.77,3550 h60
  text "3.5" at 8559.6,3550 h60
  text "1" at 5710.34,3430 h60
  text "Top Layer" at 6120.26,3430 h60
  text "0.035mm" at 7909.77,3430 h60
  text "Dielectric 1" at 6120.26,3310 h60
  text "FR-4" at 7050,3310 h60
  text "1.511mm" at 7909.77,3310 h60
  text "4.8" at 8559.6,3310 h60
  text "2" at 5710.34,3190 h60
  text "Bottom Layer" at 6120.26,3190 h60
  text "0.035mm" at 7909.77,3190 h60
  text "Bottom Solder" at 6120.26,3070 h60
  text "Solder Resist" at 7050,3070 h60
  text "0.010mm" at 7909.77,3070 h60
  text "3.5" at 8559.6,3070 h60
  text "Bottom Overlay" at 6120.26,2950 h60
  text "Total board thickness:" at 5710.34,2830 h60
  text "1.602mm" at 7909.77,2830 h60
Drill Drawing:
  circle w10: c43.5,5798.33 r33.33
  lines w10: 10.17,5481.67 26.84,5481.67 26.84,5465 60.17,5465 60.17,5481.67 76.84,5481.67 76.84,5515 60.17,5515 60.17,5531.67 26.84,5531.67 26.84,5515 10.17,5515 10.17,5481.67 ; 10.17,5631.67 26.84,5631.67 43.5,5615 60.17,5631.67 76.84,5631.67 60.17,5648.33 76.84,5665 60.17,5665 43.5,5681.67 26.84,5665 10.17,5665 26.84,5648.33 10.17,5631.67 ; 10.17,5915 43.5,5931.67 76.84,5915 60.17,5948.33 76.84,5981.67 43.5,5965 10.17,5981.67 26.84,5948.33 10.17,5915 ; 10.17,6065 76.84,6065 76.84,6131.67 10.17,6131.67 10.17,6065 ; 10.17,6281.67 76.84,6281.67 43.5,6215 10.17,6281.67
  lines w15: -49.62,5420 7480.31,5420 ; -49.62,6320 7480.31,6320 ; 501.25,5270 501.25,6470 ; 1101.1,5270 1101.1,6470 ; 2220.77,5270 2220.77,6470 ; 2726.64,5270 2726.64,6470 ; 3460.45,5270 3460.45,6470 ; 4960,5270 4960,6470 ; 5549.85,5270 5549.85,6470 ; 6295.64,5270 6295.64,6470 ; -49.62,5270 7480.31,5270 7480.31,6470 -49.62,6470 -49.62,5270
  text "Symbol" at 40.38,6365 h72
  text "Count" at 546.25,6365 h72
  text "Hole Size" at 1146.1,6365 h72
  text "Plated" at 2265.77,6365 h72
  text "Hole Type" at 2771.64,6365 h72
  text "Drill Layer Pair" at 3505.45,6365 h72
  text "Via/Pad" at 5005,6365 h72
  text "Pad Shape" at 5594.85,6365 h72
  text "Template" at 6340.64,6365 h72
  text "4" at 546.25,6215 h60
  text "35.43mil (0.900mm)" at 1146.1,6215 h60
  text "PTH" at 2265.77,6215 h60
  text "Round" at 2771.64,6215 h60
  text "Top Layer - Bottom Layer" at 3505.45,6215 h60
  text "Pad" at 5005,6215 h60
  text "Rounded" at 5594.85,6215 h60
  text "c180h90m190mx190p0" at 6340.64,6215 h60
  text "6" at 546.25,6065 h60
  text "41.34mil (1.050mm)" at 1146.1,6065 h60
  text "PTH" at 2265.77,6065 h60
  text "Round" at 2771.64,6065 h60
  text "Top Layer - Bottom Layer" at 3505.45,6065 h60
  text "Pad" at 5005,6065 h60
  text "(Mixed)" at 5594.85,6065 h60
  text "(Mixed)" at 6340.64,6065 h60
  text "8" at 546.25,5915 h60
  text "118.11mil (3.000mm)" at 1146.1,5915 h60
  text "PTH" at 2265.77,5915 h60
  text "Round" at 2771.64,5915 h60
  text "Top Layer - Bottom Layer" at 3505.45,5915 h60
  text "Pad" at 5005,5915 h60
  text "Rounded" at 5594.85,5915 h60
  text "(Mixed)" at 6340.64,5915 h60
  text "16" at 546.25,5765 h60
  text "39.37mil (1.000mm)" at 1146.1,5765 h60
  text "PTH" at 2265.77,5765 h60
  text "Round" at 2771.64,5765 h60
  text "Top Layer - Bottom Layer" at 3505.45,5765 h60
  text "Pad" at 5005,5765 h60
  text "(Mixed)" at 5594.85,5765 h60
  text "(Mixed)" at 6340.64,5765 h60
  text "120" at 546.25,5615 h60
  text "43.31mil (1.100mm)" at 1146.1,5615 h60
  text "PTH" at 2265.77,5615 h60
  text "Round" at 2771.64,5615 h60
  text "Top Layer - Bottom Layer" at 3505.45,5615 h60
  text "Pad" at 5005,5615 h60
  text "(Mixed)" at 5594.85,5615 h60
  text "(Mixed)" at 6340.64,5615 h60
  text "396" at 546.25,5465 h60
  text "11.81mil (0.300mm)" at 1146.1,5465 h60
  text "PTH" at 2265.77,5465 h60
  text "Round" at 2771.64,5465 h60
  text "Top Layer - Bottom Layer" at 3505.45,5465 h60
  text "Via" at 5005,5465 h60
  text "Rounded" at 5594.85,5465 h60
  text "v60h30m0mx0" at 6340.64,5465 h60
  text "550 Total" at 546.25,5315 h60

## Dimensions
0,4330.71 to 4724.41,4330.71 on Dimension
4724.41,4330.71 to 4724.41,0 on Dimension

## Text inside footprints (layer, text, board x,y; h text height)
U5: Top Overlay "1" at 4682.49,2762.32 h31.5 r90